# Altium PCB ATLAS(RZG2L).PcbDoc
Units mm, origin at the board's own origin, x right, y up, seen from the top; angles counter-clockwise.
Board outline 152.4 x 101.6 mm, 2 copper layers (Top Layer, Bottom Layer); 3 components, 2 nets, 686 pads, 0 vias.
Unrouted connection lines stored in the file: 281.
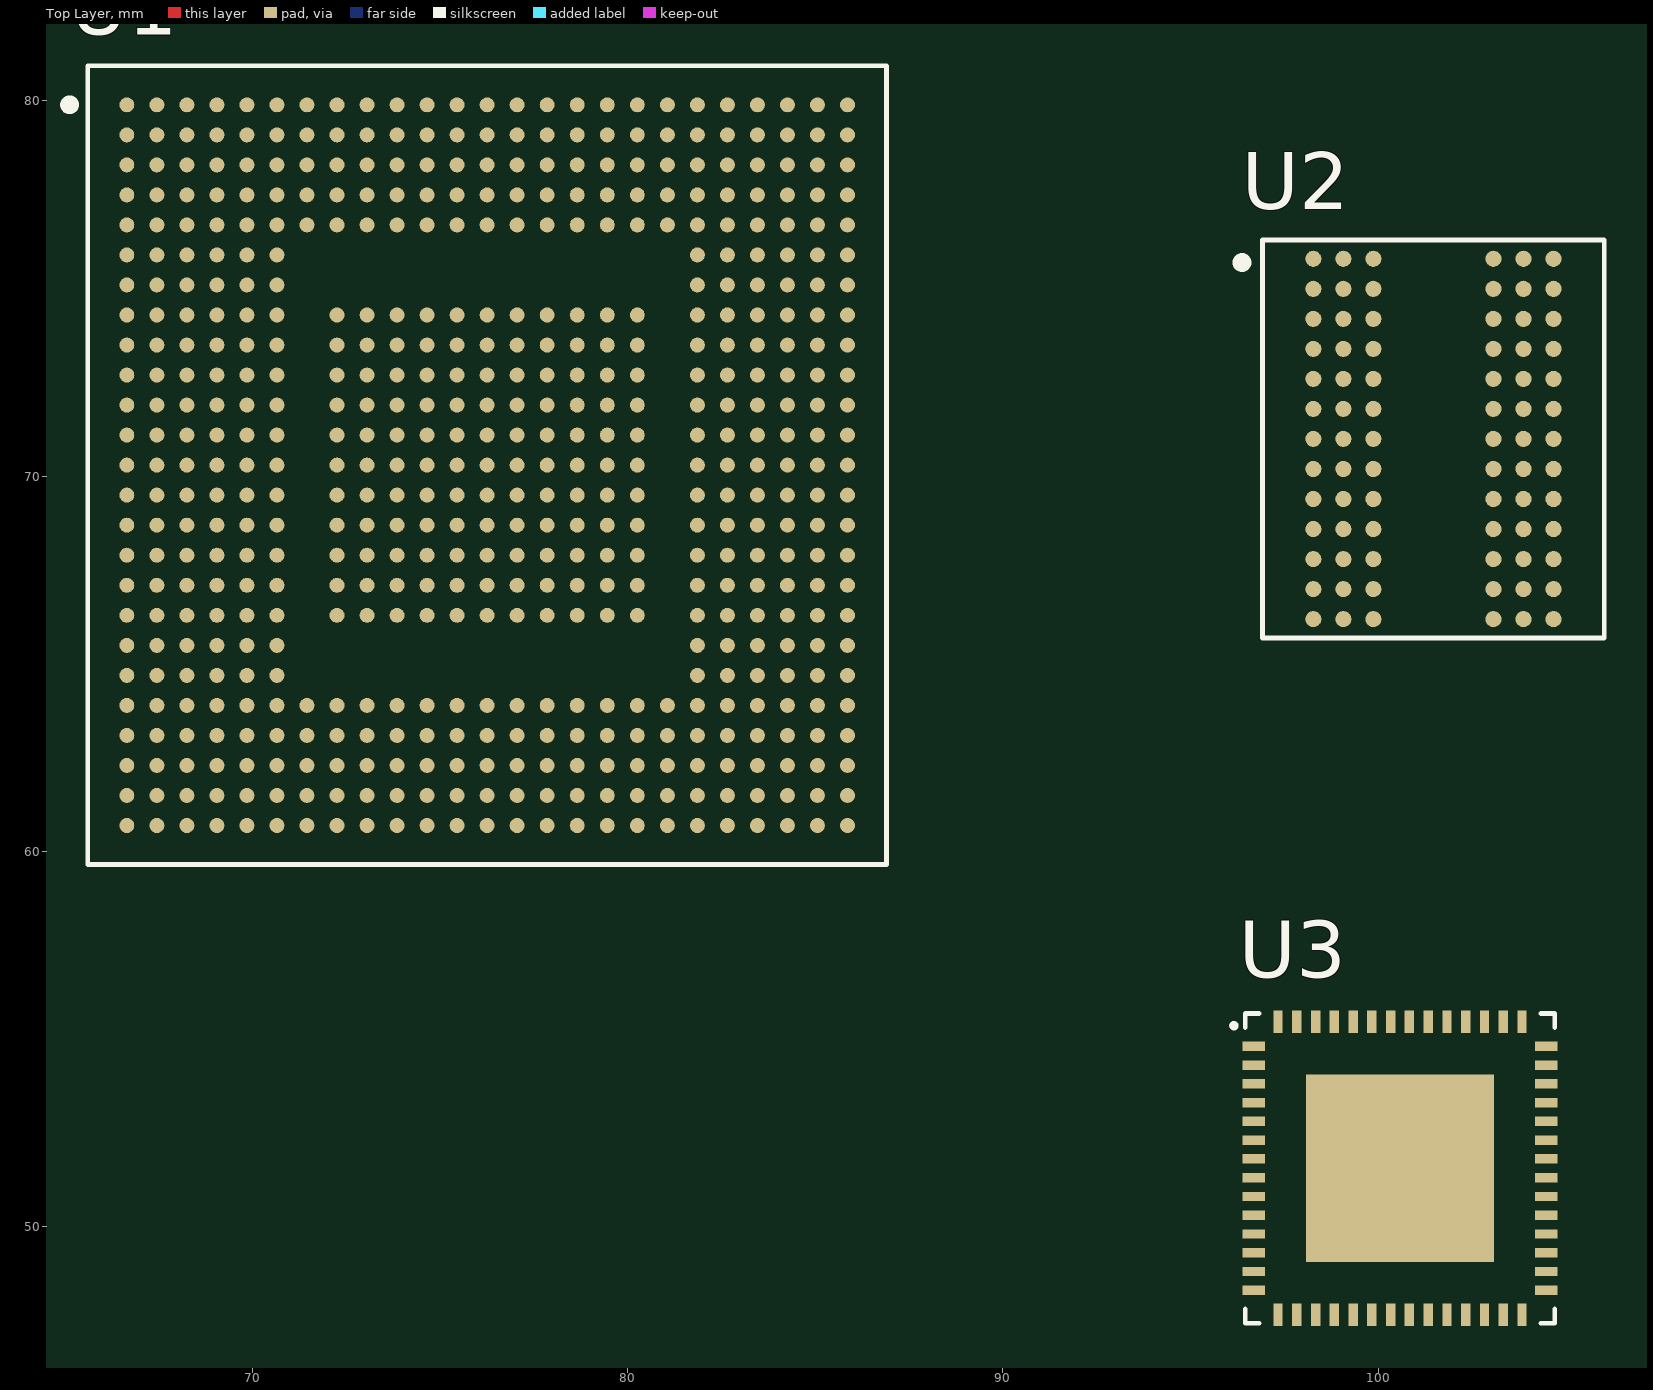
[diagram p0: Top Layer view]
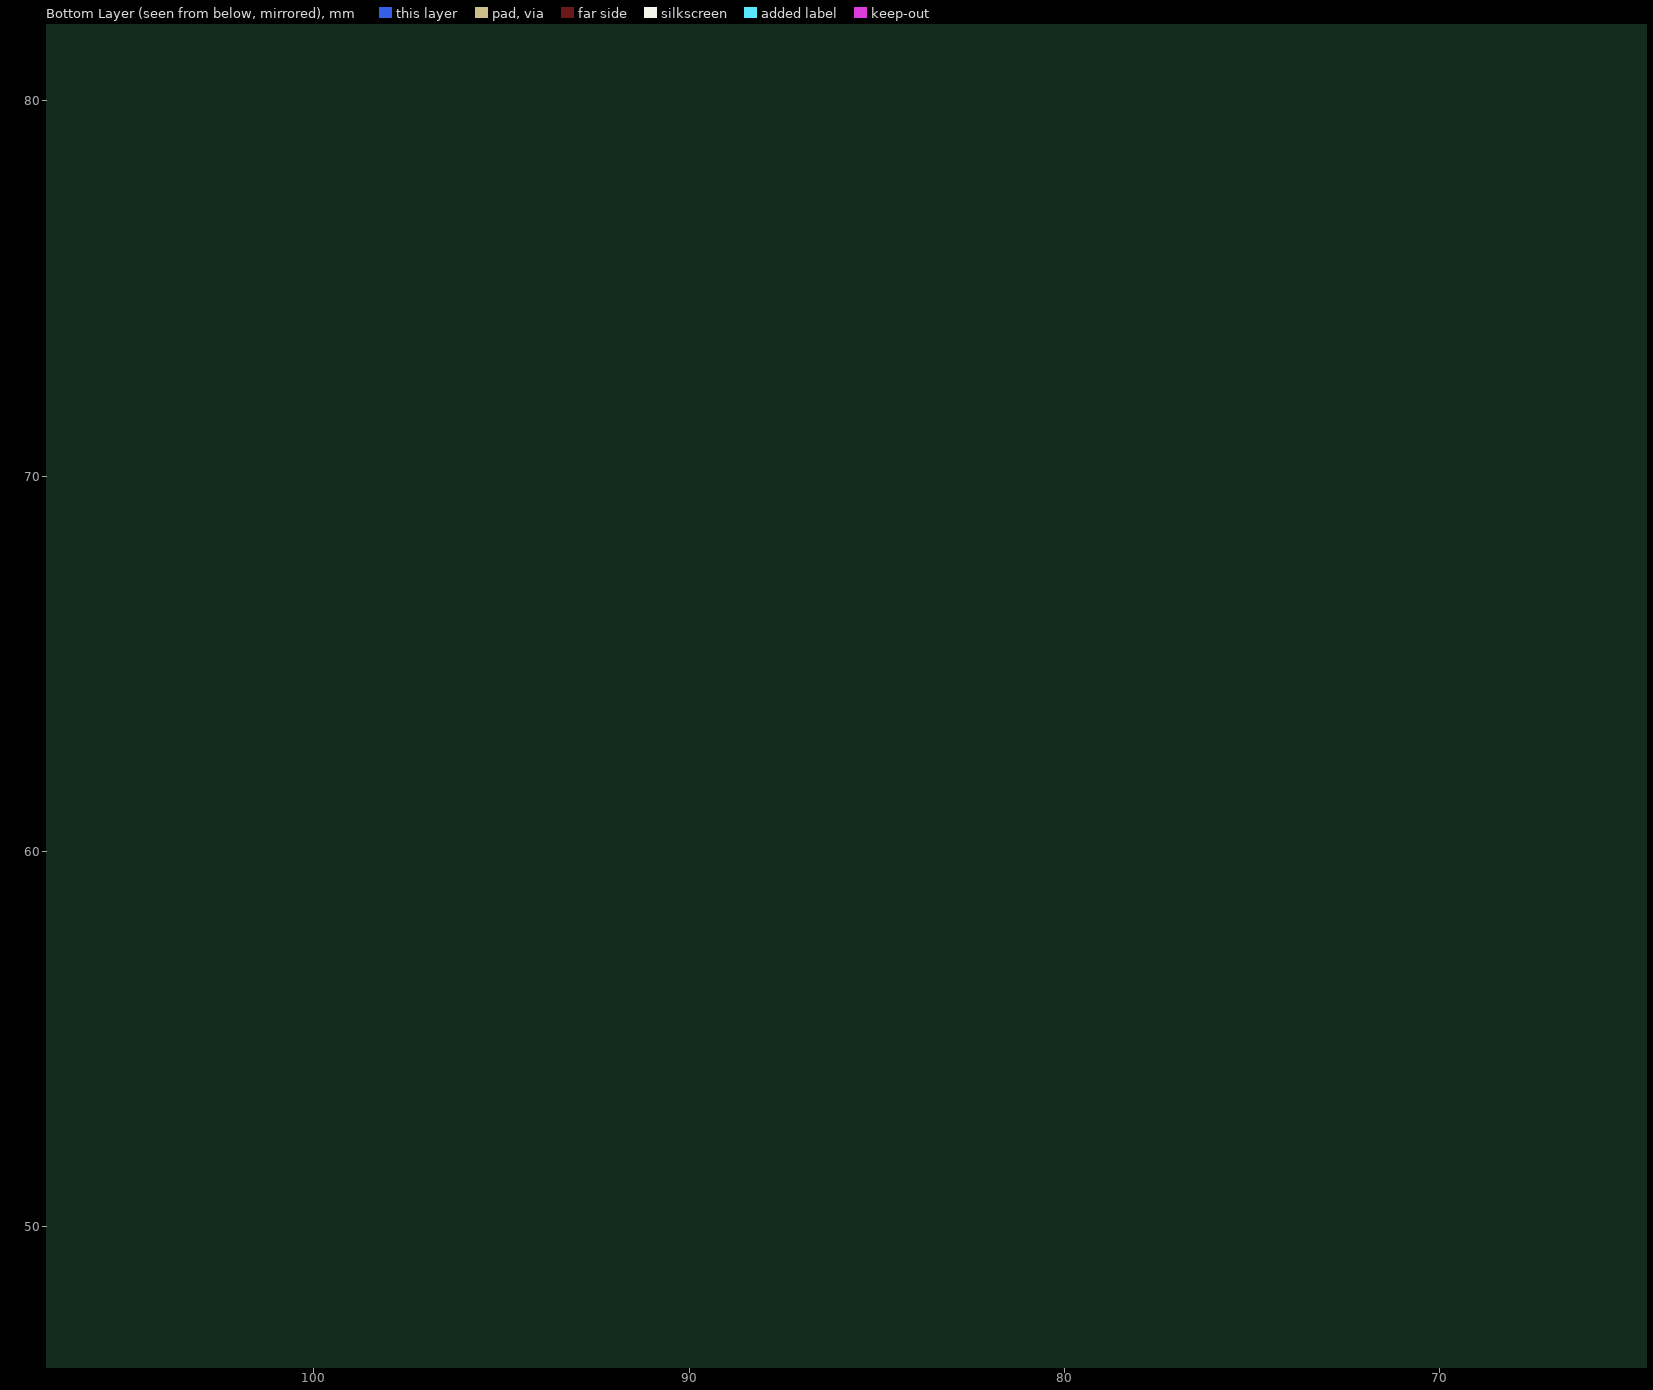
[diagram p1: Bottom Layer view, seen from below]

## Layer stack, top to bottom
Top Solder: solder mask 0.0102, Solder Resist, Dk 3.5
Top Layer: signal copper 0.0356
Dielectric 1: dielectric 0.32, FR-4, Dk 4.8
Bottom Layer: signal copper 0.0356
Bottom Solder: solder mask 0.0102, Solder Resist, Dk 3.5

## Board outline
25.4,25.4 177.8,25.4 177.8,127 25.4,127

## Design rules (kind name [scope] priority, off if disabled: settings)
Clearance [All] p1: gap=0.125 ignorepadtopadclearanceinfootprint=FALSE
PolygonConnect [All] p1: connectstyle=Relief reliefconductorwidth=0.254 reliefentries=4 polygonreliefangle="90 Angle" airgapwidth=0.254
RoutingVias [All] p1: holewidth=0.711 width=1.27 viastyle="Through Hole" minholewidth=0.3 minwidth=0.45 maxholewidth=0.711 maxwidth=1.27
SolderMaskExpansion [All] p1: expansion=0 istentingtop=FALSE
SupplyNets "Schematic Supply Nets_1" [InNet('3V3')] p1: voltage=0.000
SupplyNets "Schematic Supply Nets" [InNet('GND')] p2: voltage=0.000
Width [All] p1: maxlimit=10 minlimit=0.125 preferedwidth=0.254 minimp=50.000000 maximp=50.000000 favimp=50.000000
30 further rules are at their usual default settings.

## Classes and differential pairs
component class PMIC: U3
component class DDR: U2
component class "MPU - DDR": U1

## Components (designator, comment, footprint, x,y, rotation, side; value= is the part's Value field where it differs from the comment)
U1 "R9A07G044L28GBG#AC0" R9A07G044L28GBG#AC0 76.264,70.295 r0 top
U2 "MT40A1G4RH-083E:B" MT40A1G4RH-083E:B 101.473,70.993 r0 top
U3 "RAA215300A2GNP#HA0" L56_8x8I_MFG 100.584,51.562 r0 top

## Footprints (in the part's own frame and the unit in brackets; to place one, negate y for a bottom-side part, rotate by r counter-clockwise, add the part's x,y. Pads: shape width x height; smd on the part's side, far side on the other; paste and mask are expansions set on the pad)
L56_8x8I_MFG [mm] "Recommended Land Pattern"
  rect 0.6x0.25 smd paste+0 mask+0: 1(-3.9,3.25) 2(-3.9,2.75) 3(-3.9,2.25) 4(-3.9,1.75) 5(-3.9,1.25) 6(-3.9,0.75) 7(-3.9,0.25) 8(-3.9,-0.25) 9(-3.9,-0.75) 10(-3.9,-1.25) 11(-3.9,-1.75) 12(-3.9,-2.25) 13(-3.9,-2.75) 14(-3.9,-3.25) 29(3.9,-3.25) 30(3.9,-2.75) 31(3.9,-2.25) 32(3.9,-1.75) 33(3.9,-1.25) 34(3.9,-0.75) 35(3.9,-0.25) 36(3.9,0.25) 37(3.9,0.75) 38(3.9,1.25) 39(3.9,1.75) 40(3.9,2.25) 41(3.9,2.75) 42(3.9,3.25)
  rect 0.25x0.6 smd paste+0 mask+0: 15(-3.25,-3.9) 16(-2.75,-3.9) 17(-2.25,-3.9) 18(-1.75,-3.9) 19(-1.25,-3.9) 20(-0.75,-3.9) 21(-0.25,-3.9) 22(0.25,-3.9) 23(0.75,-3.9) 24(1.25,-3.9) 25(1.75,-3.9) 26(2.25,-3.9) 27(2.75,-3.9) 28(3.25,-3.9) 43(3.25,3.9) 44(2.75,3.9) 45(2.25,3.9) 46(1.75,3.9) 47(1.25,3.9) 48(0.75,3.9) 49(0.25,3.9) 50(-0.25,3.9) 51(-0.75,3.9) 52(-1.25,3.9) 53(-1.75,3.9) 54(-2.25,3.9) 55(-2.75,3.9) 56(-3.25,3.9)
  rect 5x5 smd paste+0 mask+0: 57(0,0)
  silkscreen extent -4.49,-4.13 4.13,4.13, body extent -4,-4 4,4, height 1
MT40A1G4RH-083E:B [mm]
  round 0.43 smd paste+0: A1(-3.2,4.8) A2(-2.4,4.8) A3(-1.6,4.8) A7(1.6,4.8) A8(2.4,4.8) A9(3.2,4.8) B1(-3.2,4) B2(-2.4,4) B3(-1.6,4) B7(1.6,4) B8(2.4,4) B9(3.2,4) C1(-3.2,3.2) C2(-2.4,3.2) C3(-1.6,3.2) C7(1.6,3.2) C8(2.4,3.2) C9(3.2,3.2) D1(-3.2,2.4) D2(-2.4,2.4) D3(-1.6,2.4) D7(1.6,2.4) D8(2.4,2.4) D9(3.2,2.4) E1(-3.2,1.6) E2(-2.4,1.6) E3(-1.6,1.6) E7(1.6,1.6) E8(2.4,1.6) E9(3.2,1.6) F1(-3.2,0.8) F2(-2.4,0.8) F3(-1.6,0.8) F7(1.6,0.8) F8(2.4,0.8) F9(3.2,0.8) G1(-3.2,0) G2(-2.4,0) G3(-1.6,0) G7(1.6,0) G8(2.4,0) G9(3.2,0) H1(-3.2,-0.8) H2(-2.4,-0.8) H3(-1.6,-0.8) H7(1.6,-0.8) H8(2.4,-0.8) H9(3.2,-0.8) J1(-3.2,-1.6) J2(-2.4,-1.6) J3(-1.6,-1.6) J7(1.6,-1.6) J8(2.4,-1.6) J9(3.2,-1.6) K1(-3.2,-2.4) K2(-2.4,-2.4) K3(-1.6,-2.4) K7(1.6,-2.4) K8(2.4,-2.4) K9(3.2,-2.4) L1(-3.2,-3.2) L2(-2.4,-3.2) L3(-1.6,-3.2) L7(1.6,-3.2) L8(2.4,-3.2) L9(3.2,-3.2) M1(-3.2,-4) M2(-2.4,-4) M3(-1.6,-4) M7(1.6,-4) M8(2.4,-4) M9(3.2,-4) N1(-3.2,-4.8) N2(-2.4,-4.8) N3(-1.6,-4.8) N7(1.6,-4.8) N8(2.4,-4.8) N9(3.2,-4.8)
  silkscreen extent -5.2,-5.3 4.55,5.3, body extent -4.55,-5.3 4.55,5.3, height 1
R9A07G044L28GBG#AC0 [mm] "BGA, 551-Leads, Body 21.00x21.00mmx1.40mm, Pitch 0.80mm"
  round 0.4 smd: A1(-9.6,9.6) A2(-8.8,9.6) A3(-8,9.6) A4(-7.2,9.6) A5(-6.4,9.6) A6(-5.6,9.6) A7(-4.8,9.6) A8(-4,9.6) A9(-3.2,9.6) A10(-2.4,9.6) A11(-1.6,9.6) A12(-0.8,9.6) A13(0,9.6) A14(0.8,9.6) A15(1.6,9.6) A16(2.4,9.6) A17(3.2,9.6) A18(4,9.6) A19(4.8,9.6) A20(5.6,9.6) A21(6.4,9.6) A22(7.2,9.6) A23(8,9.6) A24(8.8,9.6) A25(9.6,9.6) AA1(-9.6,-6.4) AA2(-8.8,-6.4) AA3(-8,-6.4) AA4(-7.2,-6.4) AA5(-6.4,-6.4) AA6(-5.6,-6.4) AA7(-4.8,-6.4) AA8(-4,-6.4) AA9(-3.2,-6.4) AA10(-2.4,-6.4) AA11(-1.6,-6.4) AA12(-0.8,-6.4) AA13(0,-6.4) AA14(0.8,-6.4) AA15(1.6,-6.4) AA16(2.4,-6.4) AA17(3.2,-6.4) AA18(4,-6.4) AA19(4.8,-6.4) AA20(5.6,-6.4) AA21(6.4,-6.4) AA22(7.2,-6.4) AA23(8,-6.4) AA24(8.8,-6.4) AA25(9.6,-6.4) AB1(-9.6,-7.2) AB2(-8.8,-7.2) AB3(-8,-7.2) AB4(-7.2,-7.2) AB5(-6.4,-7.2) AB6(-5.6,-7.2) AB7(-4.8,-7.2) AB8(-4,-7.2) AB9(-3.2,-7.2) AB10(-2.4,-7.2) AB11(-1.6,-7.2) AB12(-0.8,-7.2) AB13(0,-7.2) AB14(0.8,-7.2) AB15(1.6,-7.2) AB16(2.4,-7.2) AB17(3.2,-7.2) AB18(4,-7.2) AB19(4.8,-7.2) AB20(5.6,-7.2) AB21(6.4,-7.2) AB22(7.2,-7.2) AB23(8,-7.2) AB24(8.8,-7.2) AB25(9.6,-7.2) AC1(-9.6,-8) AC2(-8.8,-8) AC3(-8,-8) AC4(-7.2,-8) AC5(-6.4,-8) AC6(-5.6,-8) AC7(-4.8,-8) AC8(-4,-8) AC9(-3.2,-8) AC10(-2.4,-8) AC11(-1.6,-8) AC12(-0.8,-8) AC13(0,-8) AC14(0.8,-8) AC15(1.6,-8) AC16(2.4,-8) AC17(3.2,-8) AC18(4,-8) AC19(4.8,-8) AC20(5.6,-8) AC21(6.4,-8) AC22(7.2,-8) AC23(8,-8) AC24(8.8,-8) AC25(9.6,-8) AD1(-9.6,-8.8) AD2(-8.8,-8.8) AD3(-8,-8.8) AD4(-7.2,-8.8) AD5(-6.4,-8.8) AD6(-5.6,-8.8) AD7(-4.8,-8.8) AD8(-4,-8.8) AD9(-3.2,-8.8) AD10(-2.4,-8.8) AD11(-1.6,-8.8) AD12(-0.8,-8.8) AD13(0,-8.8) AD14(0.8,-8.8) AD15(1.6,-8.8) AD16(2.4,-8.8) AD17(3.2,-8.8) AD18(4,-8.8) AD19(4.8,-8.8) AD20(5.6,-8.8) AD21(6.4,-8.8) AD22(7.2,-8.8) AD23(8,-8.8) AD24(8.8,-8.8) AD25(9.6,-8.8) AE1(-9.6,-9.6) AE2(-8.8,-9.6) AE3(-8,-9.6) AE4(-7.2,-9.6) AE5(-6.4,-9.6) AE6(-5.6,-9.6) AE7(-4.8,-9.6) AE8(-4,-9.6) AE9(-3.2,-9.6) AE10(-2.4,-9.6) AE11(-1.6,-9.6) AE12(-0.8,-9.6) AE13(0,-9.6) AE14(0.8,-9.6) AE15(1.6,-9.6) AE16(2.4,-9.6) AE17(3.2,-9.6) AE18(4,-9.6) AE19(4.8,-9.6) AE20(5.6,-9.6) AE21(6.4,-9.6) AE22(7.2,-9.6) AE23(8,-9.6) AE24(8.8,-9.6) AE25(9.6,-9.6) B1(-9.6,8.8) B2(-8.8,8.8) B3(-8,8.8) B4(-7.2,8.8) B5(-6.4,8.8) B6(-5.6,8.8) B7(-4.8,8.8) B8(-4,8.8) B9(-3.2,8.8) B10(-2.4,8.8) B11(-1.6,8.8) B12(-0.8,8.8) B13(0,8.8) B14(0.8,8.8) B15(1.6,8.8) B16(2.4,8.8) B17(3.2,8.8) B18(4,8.8) B19(4.8,8.8) B20(5.6,8.8) B21(6.4,8.8) B22(7.2,8.8) B23(8,8.8) B24(8.8,8.8) B25(9.6,8.8) C1(-9.6,8) C2(-8.8,8) C3(-8,8) C4(-7.2,8) C5(-6.4,8) C6(-5.6,8) C7(-4.8,8) C8(-4,8) C9(-3.2,8) C10(-2.4,8) C11(-1.6,8) C12(-0.8,8) C13(0,8) C14(0.8,8) C15(1.6,8) C16(2.4,8) C17(3.2,8) C18(4,8) C19(4.8,8) C20(5.6,8) C21(6.4,8) C22(7.2,8) C23(8,8) C24(8.8,8) C25(9.6,8) D1(-9.6,7.2) D2(-8.8,7.2) D3(-8,7.2) D4(-7.2,7.2) D5(-6.4,7.2) D6(-5.6,7.2) D7(-4.8,7.2) D8(-4,7.2) D9(-3.2,7.2) D10(-2.4,7.2) D11(-1.6,7.2) D12(-0.8,7.2) D13(0,7.2) D14(0.8,7.2) D15(1.6,7.2) D16(2.4,7.2) D17(3.2,7.2) D18(4,7.2) D19(4.8,7.2) D20(5.6,7.2) D21(6.4,7.2) D22(7.2,7.2) D23(8,7.2) D24(8.8,7.2) D25(9.6,7.2) E1(-9.6,6.4) E2(-8.8,6.4) E3(-8,6.4) E4(-7.2,6.4) E5(-6.4,6.4) E6(-5.6,6.4) E7(-4.8,6.4) E8(-4,6.4) E9(-3.2,6.4) E10(-2.4,6.4) E11(-1.6,6.4) E12(-0.8,6.4) E13(0,6.4) E14(0.8,6.4) E15(1.6,6.4) E16(2.4,6.4) E17(3.2,6.4) E18(4,6.4) E19(4.8,6.4) E20(5.6,6.4) E21(6.4,6.4) E22(7.2,6.4) E23(8,6.4) E24(8.8,6.4) E25(9.6,6.4) F1(-9.6,5.6) F2(-8.8,5.6) F3(-8,5.6) F4(-7.2,5.6) F5(-6.4,5.6) F6(-5.6,5.6) F20(5.6,5.6) F21(6.4,5.6) F22(7.2,5.6) F23(8,5.6) F24(8.8,5.6) F25(9.6,5.6) G1(-9.6,4.8) G2(-8.8,4.8) G3(-8,4.8) G4(-7.2,4.8) G5(-6.4,4.8) G6(-5.6,4.8) G20(5.6,4.8) G21(6.4,4.8) G22(7.2,4.8) G23(8,4.8) G24(8.8,4.8) G25(9.6,4.8) H1(-9.6,4) H2(-8.8,4) H3(-8,4) H4(-7.2,4) H5(-6.4,4) H6(-5.6,4) H8(-4,4) H9(-3.2,4) H10(-2.4,4) H11(-1.6,4) H12(-0.8,4) H13(0,4) H14(0.8,4) H15(1.6,4) H16(2.4,4) H17(3.2,4) H18(4,4) H20(5.6,4) H21(6.4,4) H22(7.2,4) H23(8,4) H24(8.8,4) H25(9.6,4) J1(-9.6,3.2) J2(-8.8,3.2) J3(-8,3.2) J4(-7.2,3.2) J5(-6.4,3.2) J6(-5.6,3.2) J8(-4,3.2) J9(-3.2,3.2) J10(-2.4,3.2) J11(-1.6,3.2) J12(-0.8,3.2) J13(0,3.2) J14(0.8,3.2) J15(1.6,3.2) J16(2.4,3.2) J17(3.2,3.2) J18(4,3.2) J20(5.6,3.2) J21(6.4,3.2) J22(7.2,3.2) J23(8,3.2) J24(8.8,3.2) J25(9.6,3.2) K1(-9.6,2.4) K2(-8.8,2.4) K3(-8,2.4) K4(-7.2,2.4) K5(-6.4,2.4) K6(-5.6,2.4) K8(-4,2.4) K9(-3.2,2.4) K10(-2.4,2.4) K11(-1.6,2.4) K12(-0.8,2.4) K13(0,2.4) K14(0.8,2.4) K15(1.6,2.4) K16(2.4,2.4) K17(3.2,2.4) K18(4,2.4) K20(5.6,2.4) K21(6.4,2.4) K22(7.2,2.4) K23(8,2.4) K24(8.8,2.4) K25(9.6,2.4) L1(-9.6,1.6) L2(-8.8,1.6) L3(-8,1.6) L4(-7.2,1.6) L5(-6.4,1.6) L6(-5.6,1.6) L8(-4,1.6) L9(-3.2,1.6) L10(-2.4,1.6) L11(-1.6,1.6) L12(-0.8,1.6) L13(0,1.6) L14(0.8,1.6) L15(1.6,1.6) L16(2.4,1.6) L17(3.2,1.6) L18(4,1.6) L20(5.6,1.6) L21(6.4,1.6) L22(7.2,1.6) L23(8,1.6) L24(8.8,1.6) L25(9.6,1.6) M1(-9.6,0.8) M2(-8.8,0.8) M3(-8,0.8) M4(-7.2,0.8) M5(-6.4,0.8) M6(-5.6,0.8) M8(-4,0.8) M9(-3.2,0.8) M10(-2.4,0.8) M11(-1.6,0.8) M12(-0.8,0.8) M13(0,0.8) M14(0.8,0.8) M15(1.6,0.8) M16(2.4,0.8) M17(3.2,0.8) M18(4,0.8) M20(5.6,0.8) M21(6.4,0.8) M22(7.2,0.8) M23(8,0.8) M24(8.8,0.8) M25(9.6,0.8) N1(-9.6,0) N2(-8.8,0) N3(-8,0) N4(-7.2,0) N5(-6.4,0) N6(-5.6,0) N8(-4,0) N9(-3.2,0) N10(-2.4,0) N11(-1.6,0) N12(-0.8,0) N13(0,0) N14(0.8,0) N15(1.6,0) N16(2.4,0) N17(3.2,0) N18(4,0) N20(5.6,0) N21(6.4,0) N22(7.2,0) N23(8,0) N24(8.8,0) N25(9.6,0) P1(-9.6,-0.8) P2(-8.8,-0.8) P3(-8,-0.8) P4(-7.2,-0.8) P5(-6.4,-0.8) P6(-5.6,-0.8) P8(-4,-0.8) P9(-3.2,-0.8) P10(-2.4,-0.8) P11(-1.6,-0.8) P12(-0.8,-0.8) P13(0,-0.8) P14(0.8,-0.8) P15(1.6,-0.8) P16(2.4,-0.8) P17(3.2,-0.8) P18(4,-0.8) P20(5.6,-0.8) P21(6.4,-0.8) P22(7.2,-0.8) P23(8,-0.8) P24(8.8,-0.8) P25(9.6,-0.8) R1(-9.6,-1.6) R2(-8.8,-1.6) R3(-8,-1.6) R4(-7.2,-1.6) R5(-6.4,-1.6) R6(-5.6,-1.6) R8(-4,-1.6) R9(-3.2,-1.6) R10(-2.4,-1.6) R11(-1.6,-1.6) R12(-0.8,-1.6) R13(0,-1.6) R14(0.8,-1.6) R15(1.6,-1.6) R16(2.4,-1.6) R17(3.2,-1.6) R18(4,-1.6) R20(5.6,-1.6) R21(6.4,-1.6) R22(7.2,-1.6) R23(8,-1.6) R24(8.8,-1.6) R25(9.6,-1.6) T1(-9.6,-2.4) T2(-8.8,-2.4) T3(-8,-2.4) T4(-7.2,-2.4) T5(-6.4,-2.4) T6(-5.6,-2.4) T8(-4,-2.4) T9(-3.2,-2.4) T10(-2.4,-2.4) T11(-1.6,-2.4) T12(-0.8,-2.4) T13(0,-2.4) T14(0.8,-2.4) T15(1.6,-2.4) T16(2.4,-2.4) T17(3.2,-2.4) T18(4,-2.4) T20(5.6,-2.4) T21(6.4,-2.4) T22(7.2,-2.4) T23(8,-2.4) T24(8.8,-2.4) T25(9.6,-2.4) U1(-9.6,-3.2) U2(-8.8,-3.2) U3(-8,-3.2) U4(-7.2,-3.2) U5(-6.4,-3.2) U6(-5.6,-3.2) U8(-4,-3.2) U9(-3.2,-3.2) U10(-2.4,-3.2) U11(-1.6,-3.2) U12(-0.8,-3.2) U13(0,-3.2) U14(0.8,-3.2) U15(1.6,-3.2) U16(2.4,-3.2) U17(3.2,-3.2) U18(4,-3.2) U20(5.6,-3.2) U21(6.4,-3.2) U22(7.2,-3.2) U23(8,-3.2) U24(8.8,-3.2) U25(9.6,-3.2) V1(-9.6,-4) V2(-8.8,-4) V3(-8,-4) V4(-7.2,-4) V5(-6.4,-4) V6(-5.6,-4) V8(-4,-4) V9(-3.2,-4) V10(-2.4,-4) V11(-1.6,-4) V12(-0.8,-4) V13(0,-4) V14(0.8,-4) V15(1.6,-4) V16(2.4,-4) V17(3.2,-4) V18(4,-4) V20(5.6,-4) V21(6.4,-4) V22(7.2,-4) V23(8,-4) V24(8.8,-4) V25(9.6,-4) W1(-9.6,-4.8) W2(-8.8,-4.8) W3(-8,-4.8) W4(-7.2,-4.8) W5(-6.4,-4.8) W6(-5.6,-4.8) W20(5.6,-4.8) W21(6.4,-4.8) W22(7.2,-4.8) W23(8,-4.8) W24(8.8,-4.8) W25(9.6,-4.8) Y1(-9.6,-5.6) Y2(-8.8,-5.6) Y3(-8,-5.6) Y4(-7.2,-5.6) Y5(-6.4,-5.6) Y6(-5.6,-5.6) Y20(5.6,-5.6) Y21(6.4,-5.6) Y22(7.2,-5.6) Y23(8,-5.6) Y24(8.8,-5.6) Y25(9.6,-5.6)
  silkscreen extent -11.25,-10.64 10.64,10.64, body extent -10.5,-10.5 10.5,10.5, height 1.4

## Part data
U1: "MPU RZ/G2L ARM Cortex-A55+/ARM Cortex-M33 RISC 64-Bit 1.2GHz 1.8V/3.3V 551-Pin BGA", Case/Package=BGA, Frequency=1.2GHz, Manufacturer Lifecycle Status=ACTIVE, Max Supply Voltage=3.63V, Min Supply Voltage=2.97V, China RoHS=Compliant, ComponentLink1Description="Manufacturer's Website", ComponentLink1URL=http://www.renesas.com, ComponentLink2Description="Datasheet URL", ComponentLink2URL=https://octopart.com/cad-content/api/get-model-datasheet/15189/122020395, ComponentLink3Description="Manufacturer's Package Drawing", ComponentLink3URL=https://www.renesas.com/en/document/psc/package-drawing-lfbga-551pin-plbg0551ga, Export Control Classification Number (ECCN) Code=3A991, Height=1.4mm, HelpURL=https://octopart.com/cad-content/api/get-model-datasheet/15189/122020395, Length=21mm, Lifecycle Status=Production, Max Frequency=1.2GHz, Mount="Surface Mount", Number of Pins=551, Number of USB Channels=2, Pitch=800µm, RAM Size=128kB, RoHS=Compliant, Width=21mm
U2: "SDRAM - DDR4 Memory IC 4Gb (1G x 4) Parallel 1.2 GHz 19 ns 78-FBGA (9x10.5)", Package="FBGA-78 Micron", Check_prices=https://www.snapeda.com/parts/MT40A1G4RH-083E:B/Micron/view-part/?ref=eda, MF="Micron Technology", MP=MT40A1G4RH-083E:B, SnapEDA_Link=https://www.snapeda.com/parts/MT40A1G4RH-083E:B/Micron/view-part/?ref=snap
U3: library part CMP-00572-119775525-1, "Power Management Specialized - PMIC RAA215300A2GNP#HA0 9-Channel PMIC with RTC 56L QFN", Case/Package=QFN, Manufacturer Lifecycle Status=ACTIVE, Max Operating Temperature=105°C, Max Supply Current=4.8mA, Max Supply Voltage=5.5V, Min Operating Temperature=-40°C, Min Supply Voltage=2.7V, Nominal Supply Voltage (DC)=5V, Package Quantity=0, Threshold Voltage=2.1V, ComponentLink1Description="Manufacturer's Website", ComponentLink1URL=http://www.renesas.com, ComponentLink2Description="Datasheet URL", ComponentLink2URL=https://octopart.com/cad-content/api/get-model-datasheet/15189/119775525, ComponentLink3Description="Manufacturer's Package Drawing", ComponentLink3URL=https://www.renesas.com/en/document/psc/l568x8i-56-lead-quad-flat-no-lead-plastic-package-5x5mm-exposed-paddle, Export Control Classification Number (ECCN) Code=EAR99, Harmonized Tariff Schedule (HTS) Code=8540000000, Height=950µm, Height - Seated (Max)=1mm, HelpURL=https://octopart.com/cad-content/api/get-model-datasheet/15189/119775525, Introduction Date=2022-04-01, Length=8mm, Lifecycle Status=Production, MSL=3, Number of Channels=9, Number Of Circuits=1, Number of Pins=56, Number of Terminals=56, Part Family=RAA215300, Pitch=500µm, REACH SVHC=Yes, RoHS=Compliant, Terminal Pitch=500µm, Width=8mm

## Nets (pads, with @x,y where several pads share a name; then routed paths per layer and width w, separated by ;. In a path a pad name is that pad's centre, name@x,y a point inside that pad or via, vN(x,y) a via of type N, cw(c..) or ccw(c..) an arc to the next point about the centre after c; other vN are vias at no path point)
3V3: U1.AA8 U1.AA10 U1.AA11 U1.AA13 U1.AA14 U1.AA17 U1.AA18 U1.AA19 U1.AB6 U1.AB12 U1.AC6 U1.E6 U1.E7 U1.E10 U1.E13 U1.E14 U1.E17 U1.E19 U1.E21 U1.F6 U1.G5 U1.G6 U1.H8 U1.H9 U1.H11 U1.H12 U1.H14 U1.H15 U1.H17 U1.H18 U1.H20 U1.J5 U1.J6 U1.J10 U1.J11 U1.J13 U1.J15 U1.J16 U1.K8 U1.K9 U1.K17 U1.K18 U1.K20 U1.L5 U1.L6 U1.M5 U1.M6 U1.M8 U1.M9 U1.M17 U1.M18 U1.M20 U1.P5 U1.P6 U1.P8 U1.P9 U1.P17 U1.P18 U1.P20 U1.T4 U1.T5 U1.T6 U1.T8 U1.T9 U1.T17 U1.T18 U1.T20 U1.U5 U1.U6 U1.U8 U1.U10 U1.U11 U1.U13 U1.U15 U1.U16 U1.V8 U1.V9 U1.V13 U1.V14 U1.V17 U1.V18 U1.V20 U1.W5 U1.W6 U1.W20 U1.Y20
GND: U1.A1 U1.A7 U1.A20 U1.A23 U1.A25 U1.AA4 U1.AA5 U1.AA6 U1.AA12 U1.AA15 U1.AA20 U1.AA21 U1.AA22 U1.AB3 U1.AB7 U1.AB8 U1.AB9 U1.AB10 U1.AB11 U1.AB13 U1.AB14 U1.AB15 U1.AB17 U1.AB20 U1.AB25 U1.AC7 U1.AC8 U1.AC11 U1.AC12 U1.AC15 U1.AC23 U1.AD24 U1.AE1 U1.AE25 U1.B24 U1.D1 U1.D6 U1.D12 U1.D13 U1.D19 U1.D22 U1.D24 U1.E5 U1.E8 U1.E9 U1.E12 U1.E15 U1.E16 U1.E18 U1.E20 U1.E22 U1.F5 U1.F20 U1.F21 U1.F22 U1.F23 U1.G1 U1.G20 U1.G21 U1.G22 U1.H5 U1.H6 U1.H10 U1.H13 U1.H16 U1.H21 U1.H22 U1.J4 U1.J8 U1.J9 U1.J12 U1.J14 U1.J17 U1.J18 U1.J20 U1.J21 U1.J22 U1.J23 U1.K1 U1.K4 U1.K5 U1.K6 U1.K10 U1.K11 U1.K12 U1.K13 U1.K14 U1.K15 U1.K16 U1.K21 U1.K22 U1.L8 U1.L9 U1.L10 U1.L11 U1.L12 U1.L13 U1.L14 U1.L15 U1.L16 U1.L17 U1.L18 U1.L20 U1.L21 U1.L22 U1.M4 U1.M10 U1.M11 U1.M12 U1.M13 U1.M14 U1.M15 U1.M16 U1.M21 U1.M22 U1.M23 U1.N5 U1.N6 U1.N8 U1.N9 U1.N10 U1.N11 U1.N12 U1.N13 U1.N14 U1.N15 U1.N16 U1.N17 U1.N18 U1.N20 U1.N21 U1.N22 U1.P4 U1.P10 U1.P11 U1.P12 U1.P13 U1.P14 U1.P15 U1.P16 U1.P21 U1.P22 U1.P23 U1.R5 U1.R6 U1.R8 U1.R9 U1.R10 U1.R11 U1.R12 U1.R13 U1.R14 U1.R15 U1.R16 U1.R17 U1.R18 U1.R20 U1.R21 U1.R22 U1.R23 U1.T1 U1.T10 U1.T11 U1.T12 U1.T13 U1.T14 U1.T15 U1.T16 U1.T21 U1.T22 U1.T23 U1.U9 U1.U12 U1.U14 U1.U17 U1.U18 U1.U20 U1.U21 U1.U22 U1.V4 U1.V5 U1.V6 U1.V10 U1.V11 U1.V12 U1.V15 U1.V16 U1.V21 U1.V22 U1.V23 U1.W21 U1.W22 U1.Y5 U1.Y6 U1.Y21 U1.Y22 U1.Y23
pads on no net: U1.A2 U1.A3 U1.A4 U1.A5 U1.A6 U1.A8 U1.A9 U1.A10 U1.A11 U1.A12 U1.A13 U1.A14 U1.A15 U1.A16 U1.A17 U1.A18 U1.A19 U1.A21 U1.A22 U1.A24 U1.AA1 U1.AA2 U1.AA3 U1.AA7 U1.AA9 U1.AA16 U1.AA23 U1.AA24 U1.AA25 U1.AB1 U1.AB2 U1.AB4 U1.AB5 U1.AB16 U1.AB18 U1.AB19 U1.AB21 U1.AB22 U1.AB23 U1.AB24 U1.AC1 U1.AC2 U1.AC3 U1.AC4 U1.AC5 U1.AC9 U1.AC10 U1.AC13 U1.AC14 U1.AC16 U1.AC17 U1.AC18 U1.AC19 U1.AC20 U1.AC21 U1.AC22 U1.AC24 U1.AC25 U1.AD1 U1.AD2 U1.AD3 U1.AD4 U1.AD5 U1.AD6 U1.AD7 U1.AD8 U1.AD9 U1.AD10 U1.AD11 U1.AD12 U1.AD13 U1.AD14 U1.AD15 U1.AD16 U1.AD17 U1.AD18 U1.AD19 U1.AD20 U1.AD21 U1.AD22 U1.AD23 U1.AD25 U1.AE2 U1.AE3 U1.AE4 U1.AE5 U1.AE6 U1.AE7 U1.AE8 U1.AE9 U1.AE10 U1.AE11 U1.AE12 U1.AE13 U1.AE14 U1.AE15 U1.AE16 U1.AE17 U1.AE18 U1.AE19 U1.AE20 U1.AE21 U1.AE22 U1.AE23 U1.AE24 U1.B1 U1.B2 U1.B3 U1.B4 U1.B5 U1.B6 U1.B7 U1.B8 U1.B9 U1.B10 U1.B11 U1.B12 U1.B13 U1.B14 U1.B15 U1.B16 U1.B17 U1.B18 U1.B19 U1.B20 U1.B21 U1.B22 U1.B23 U1.B25 U1.C1 U1.C2 U1.C3 U1.C4 U1.C5 U1.C6 U1.C7 U1.C8 U1.C9 U1.C10 U1.C11 U1.C12 U1.C13 U1.C14 U1.C15 U1.C16 U1.C17 U1.C18 U1.C19 U1.C20 U1.C21 U1.C22 U1.C23 U1.C24 U1.C25 U1.D2 U1.D3 U1.D4 U1.D5 U1.D7 U1.D8 U1.D9 U1.D10 U1.D11 U1.D14 U1.D15 U1.D16 U1.D17 U1.D18 U1.D20 U1.D21 U1.D23 U1.D25 U1.E1 U1.E2 U1.E3 U1.E4 U1.E11 U1.E23 U1.E24 U1.E25 U1.F1 U1.F2 U1.F3 U1.F4 U1.F24 U1.F25 U1.G2 U1.G3 U1.G4 U1.G23 U1.G24 U1.G25 U1.H1 U1.H2 U1.H3 U1.H4 U1.H23 U1.H24 U1.H25 U1.J1 U1.J2 U1.J3 U1.J24 U1.J25 U1.K2 U1.K3 U1.K23 U1.K24 U1.K25 U1.L1 U1.L2 U1.L3 U1.L4 U1.L23 U1.L24 U1.L25 U1.M1 U1.M2 U1.M3 U1.M24 U1.M25 U1.N1 U1.N2 U1.N3 U1.N4 U1.N23 U1.N24 U1.N25 U1.P1 U1.P2 U1.P3 U1.P24 U1.P25 U1.R1 U1.R2 U1.R3 U1.R4 U1.R24 U1.R25 U1.T2 U1.T3 U1.T24 U1.T25 U1.U1 U1.U2 U1.U3 U1.U4 U1.U23 U1.U24 U1.U25 U1.V1 U1.V2 U1.V3 U1.V24 U1.V25 U1.W1 U1.W2 U1.W3 U1.W4 U1.W23 U1.W24 U1.W25 U1.Y1 U1.Y2 U1.Y3 U1.Y4 U1.Y24 U1.Y25 U2.A1 U2.A2 U2.A3 U2.A7 U2.A8 U2.A9 U2.B1 U2.B2 U2.B3 U2.B7 U2.B8 U2.B9 U2.C1 U2.C2 U2.C3 U2.C7 U2.C8 U2.C9 U2.D1 U2.D2 U2.D3 U2.D7 U2.D8 U2.D9 U2.E1 U2.E2 U2.E3 U2.E7 U2.E8 U2.E9 U2.F1 U2.F2 U2.F3 U2.F7 U2.F8 U2.F9 U2.G1 U2.G2 U2.G3 U2.G7 U2.G8 U2.G9 U2.H1 U2.H2 U2.H3 U2.H7 U2.H8 U2.H9 U2.J1 U2.J2 U2.J3 U2.J7 U2.J8 U2.J9 U2.K1 U2.K2 U2.K3 U2.K7 U2.K8 U2.K9 U2.L1 U2.L2 U2.L3 U2.L7 U2.L8 U2.L9 U2.M1 U2.M2 U2.M3 U2.M7 U2.M8 U2.M9 U2.N1 U2.N2 U2.N3 U2.N7 U2.N8 U2.N9 U3.1 U3.2 U3.3 U3.4 U3.5 U3.6 U3.7 U3.8 U3.9 U3.10 U3.11 U3.12 U3.13 U3.14 U3.15 U3.16 U3.17 U3.18 U3.19 U3.20 U3.21 U3.22 U3.23 U3.24 U3.25 U3.26 U3.27 U3.28 U3.29 U3.30 U3.31 U3.32 U3.33 U3.34 U3.35 U3.36 U3.37 U3.38 U3.39 U3.40 U3.41 U3.42 U3.43 U3.44 U3.45 U3.46 U3.47 U3.48 U3.49 U3.50 U3.51 U3.52 U3.53 U3.54 U3.55 U3.56 U3.57